# Altium PCB SCD2326功率板-V0.3.PcbDoc
Units mm, origin at the board's own origin, x right, y up, seen from the top; angles counter-clockwise.
Board outline 103 x 53 mm, 2 copper layers (Top Layer, Bottom Layer), stack 0.325 mm thick; 31 components, 13 nets, 105 pads, 0 vias.
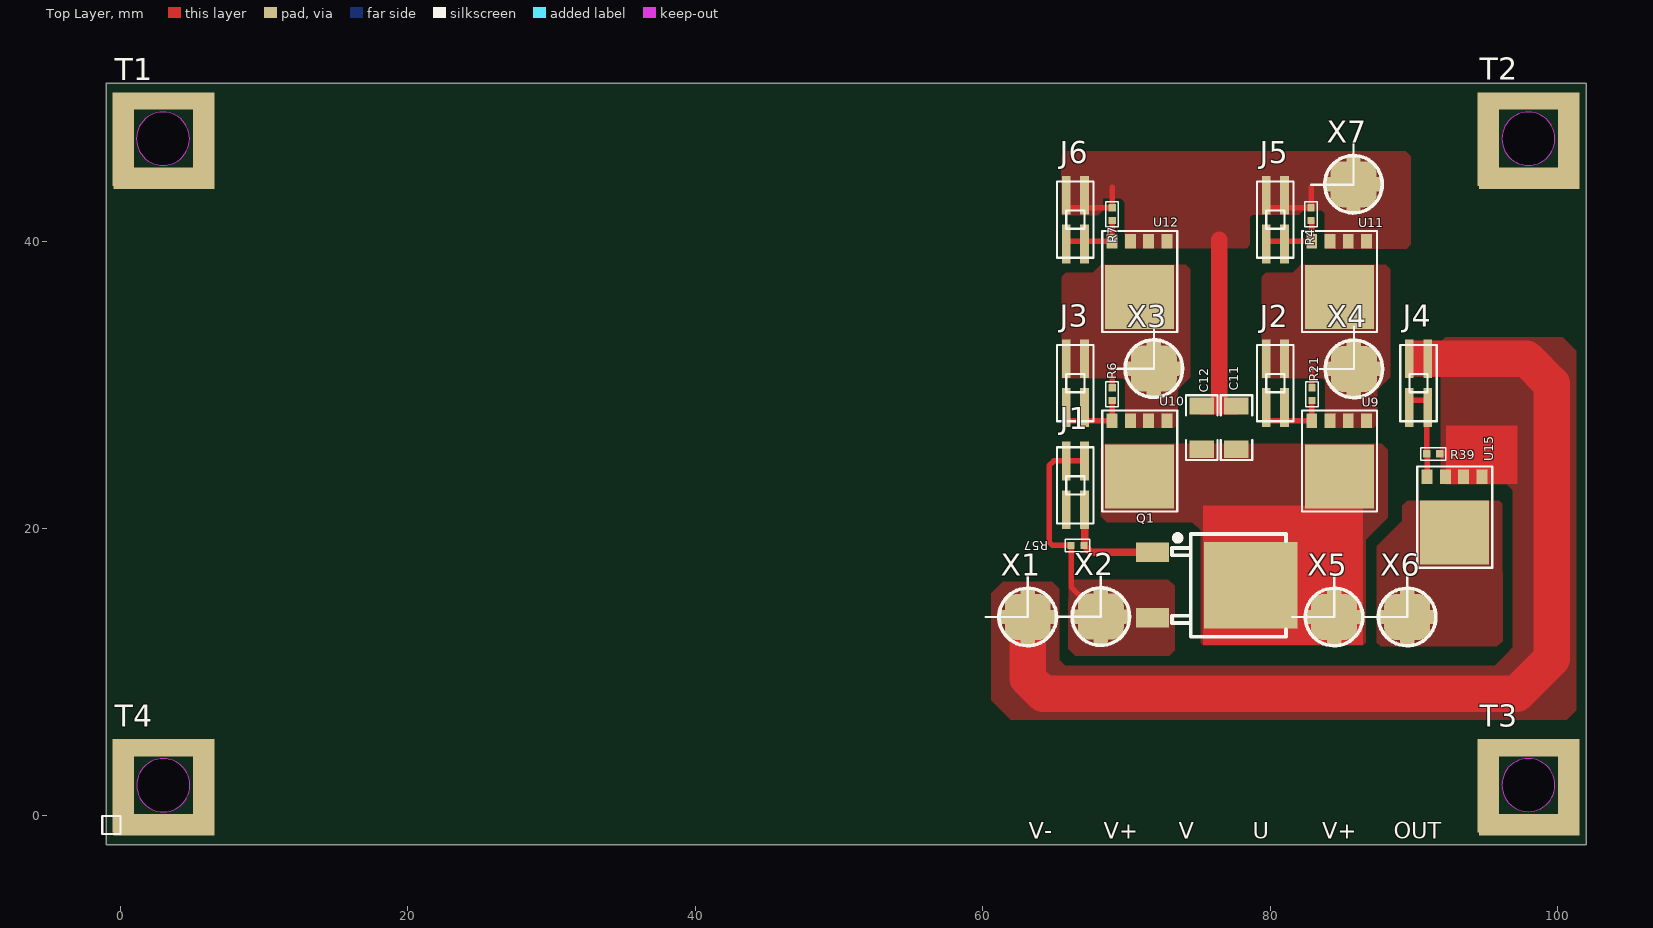
[diagram p0: Top Layer view]
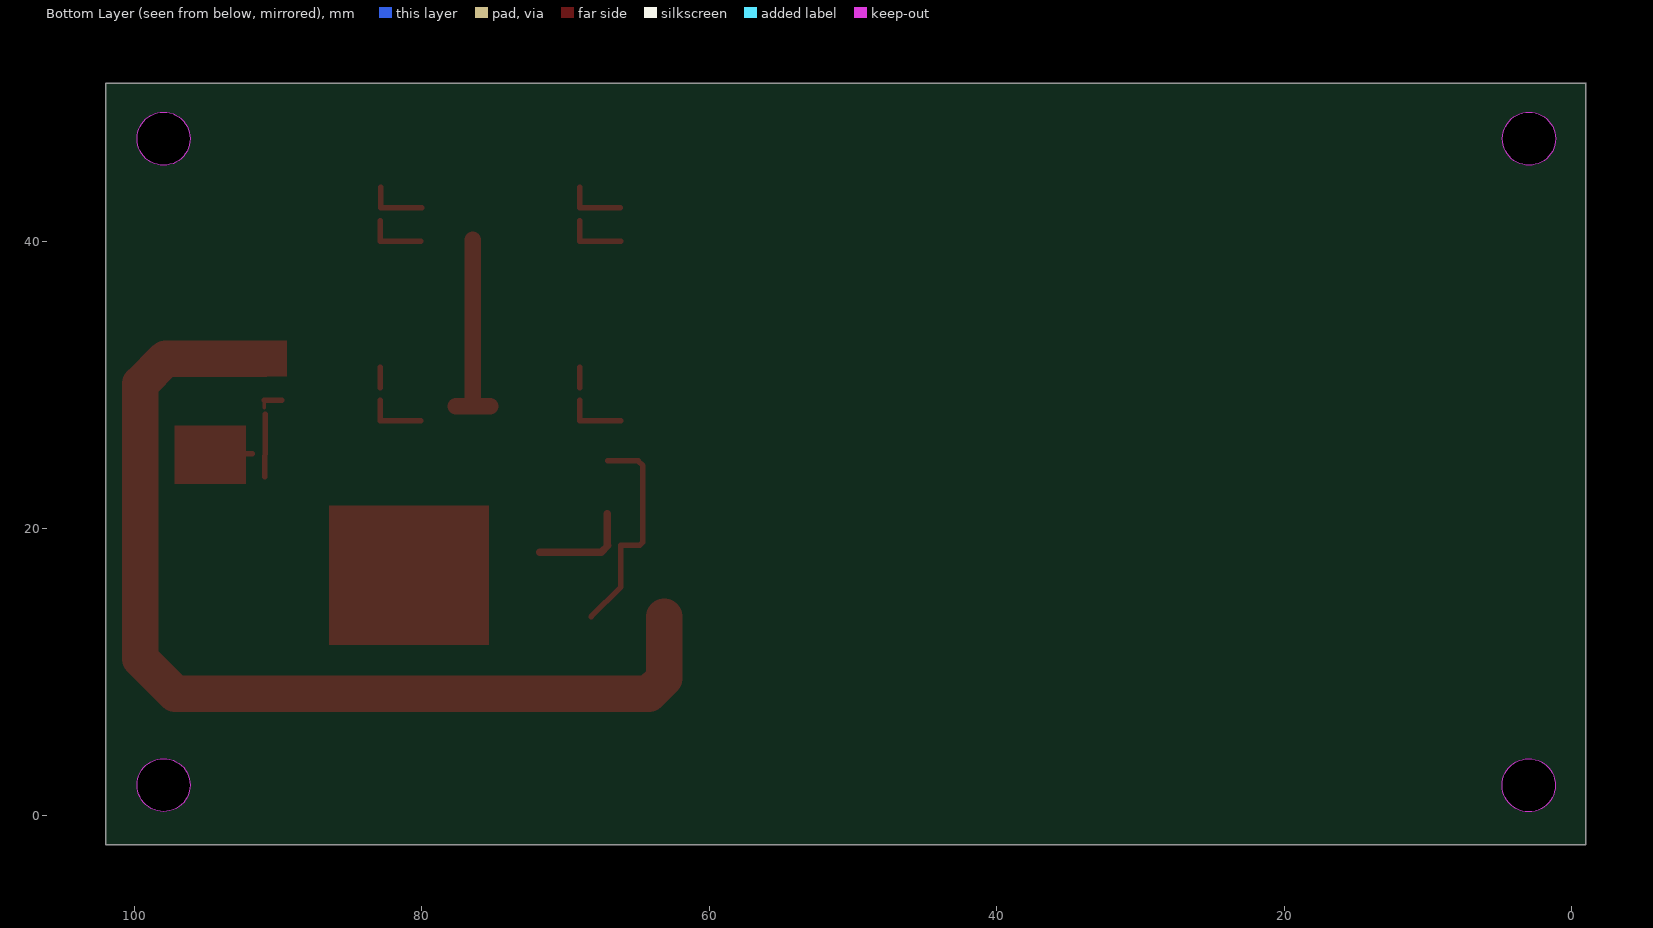
[diagram p1: Bottom Layer view, seen from below]

## Layer stack, top to bottom
Top Solder: solder mask 0.0102, Solder Resist, Dk 3.5
Top Layer: signal copper 0.0356
Dielectric 1: core 0.254, PP-006, Dk 4.2
Bottom Layer: signal copper 0.0356
Bottom Solder: solder mask 0.0102, Solder Resist, Dk 3.5

## Board outline
-0.991,-2 102,-2 102,51 -0.991,51 -1,50.978
cut-out: 96.125,2.144 ccw(c97.975,2.144) 97.975,0.294 ccw(c97.975,2.144) 99.825,2.144 ccw(c97.975,2.144) 97.975,3.994 ccw(c97.975,2.144)
cut-out: 1.13,2.128 ccw(c2.98,2.128) 2.98,0.278 ccw(c2.98,2.128) 4.83,2.128 ccw(c2.98,2.128) 2.98,3.978 ccw(c2.98,2.128)
cut-out: 1.103,47.127 ccw(c2.953,47.127) 2.953,45.277 ccw(c2.953,47.127) 4.803,47.127 ccw(c2.953,47.127) 2.953,48.977 ccw(c2.953,47.127)
cut-out: 96.125,47.127 ccw(c97.975,47.127) 97.975,45.277 ccw(c97.975,47.127) 99.825,47.127 ccw(c97.975,47.127) 97.975,48.977 ccw(c97.975,47.127)

## Design rules (kind name [scope] priority, off if disabled: settings)
Clearance [All] p1: gap=0.152
HoleSize [All] p1 off: absolutevalues=TRUE maxlimit=2.54 minlimit=0.025 maxpercent=80.000 minpercent=20.000
HoleToHoleClearance [All] p1 off: gap=0.254 allowstackedmicrovias=TRUE
LayerPairs [All] p1 off: enforce=TRUE
MinimumSolderMaskSliver [All] p1 off: minsoldermaskwidth=0.254
PlaneConnect [All] p1: planeconnectstyle=Direct reliefexpansion=0.508 reliefentries=4 reliefconductorwidth=0.254 reliefairgap=0.254
PolygonConnect [All] p1: connectstyle=Direct reliefconductorwidth=0.254 reliefentries=4 polygonreliefangle="90 Angle" airgapwidth=0.254
RoutingVias [All] p1: holewidth=0.711 width=1.27 viastyle="Through Hole" minholewidth=0.25 minwidth=0.45 maxholewidth=0.711 maxwidth=1.27
SilkToBoardRegionClearance [All] p1 off:
SilkToSilkClearance [All] p1 off: silktosilkclearance=0.254
SilkToSolderMaskClearance [IsPad] p1 off: minsilkscreentomaskgap=0.254 clearancetoexposedcopper=TRUE
SolderMaskExpansion [All] p1: expansion=0.102
Width [All] p1: maxlimit=2.54 minlimit=0.152 preferedwidth=0.254
21 further rules are at their usual default settings.

## Components (designator, comment, footprint, x,y, rotation, side; value= is the part's Value field where it differs from the comment)
C11 "10uF/50V/10%/1206/X7R" SC1206 77.659,27.018 r270 top
C12 "10uF/50V/10%/1206/X7R" SC1206 75.246,27.018 r270 top
J1 "1.27mm 2*2P贴片排针" CON_1D27_2X2TP 65.811,23 r90 top
J2 "1.27mm 2*2P贴片排针" CON_1D27_2X2TP 79.733,30.115 r90 top
J3 "1.27mm 2*2P贴片排针" CON_1D27_2X2TP 65.811,30.115 r90 top
J4 "1.27mm 2*2P贴片排针" CON_1D27_2X2TP 89.69,30.115 r90 top
J5 "1.27mm 2*2P贴片排针" CON_1D27_2X2TP 79.733,41.494 r90 top
J6 "1.27mm 2*2P贴片排针" CON_1D27_2X2TP 65.811,41.494 r90 top
Q1 "CMD80P06" TO-252-2 71.704,18.339 r270 top
R4 "10K/1%/0402" SR0402#1 82.855,41.872 r90 top
R6 "10K/1%/0402" SR0402#1 69.012,29.35 r90 top
R7 "10K/1%/0402" SR0402#1 69.012,41.872 r90 top
R21 "10K/1%/0402" SR0402#1 82.906,29.35 r90 top
R39 "10K/1%/0402" SR0402#2 91.364,25.171 r180 top
R57 "10K/1%" SR0402#1 66.599,18.821 r180 top
T1 "M3X₵5.5X4.0+₵3.6X1.5" M3_TP 3,47 r0 top
T2 "M3X₵5.5X4.0+₵3.6X1.5" M3_TP 98,47 r0 top
T3 "M3X₵5.5X4.0+₵3.6X1.5" M3_TP 98,2 r0 top
T4 "M3X₵5.5X4.0+₵3.6X1.5" M3_TP 3,2 r0 top
U9 "NCEP065N12" PG-TDSON-8 84.763,25.797 r180 top
U10 "NCEP065N12" PG-TDSON-8 70.866,25.797 r180 top
U11 "NCEP065N12" PG-TDSON-8 84.763,38.293 r180 top
U12 "NCEP065N12" PG-TDSON-8 70.866,38.293 r180 top
U15 "NCEP065N12" PG-TDSON-8 92.786,21.895 r180 top
X1 "底直径3身直径2总长6.5mm铜镀金实心导电车件铜柱" CON_3D0_1TP 63.135,13.843 r180 top
X2 "底直径3身直径2总长6.5mm铜镀金实心导电车件铜柱" CON_3D0_1TP 68.218,13.868 r180 top
X3 "底直径3身直径2总长6.5mm铜镀金实心导电车件铜柱" CON_3D0_1TP 71.907,31.128 r180 top
X4 "底直径3身直径2总长6.5mm铜镀金实心导电车件铜柱" CON_3D0_1TP 85.829,31.106 r180 top
X5 "底直径3身直径2总长6.5mm铜镀金实心导电车件铜柱" CON_3D0_1TP 84.455,13.843 r180 top
X6 "底直径3身直径2总长6.5mm铜镀金实心导电车件铜柱" CON_3D0_1TP 89.538,13.843 r180 top
X7 "底直径3身直径2总长6.5mm铜镀金实心导电车件铜柱" CON_3D0_1TP 85.801,43.955 r0 top

## Footprints (in the part's own frame and the unit in brackets; to place one, negate y for a bottom-side part, rotate by r counter-clockwise, add the part's x,y. Pads: shape width x height; smd on the part's side, far side on the other; paste and mask are expansions set on the pad)
CON_1D27_2X2TP [mm]
  rect 2.7x0.6 smd: 1(-1.7,0) 2(1.7,0) 3(-1.7,-1.27) 4(1.7,-1.27)
  silkscreen extent -2.65,-1.91 2.65,0.64
CON_3D0_1TP [mm]
  rrect50% 4x1 smd: 1(-0.01,0)
  rrect50% 3.2x3.2 smd: 1(0,0)
  rrect50% 1x4 smd: 1(0,-0.02)
  silkscreen extent -2,-2 2,2
M3_TP [mm]
  rect 1.5x6.5 smd: 1(-2.819,0.102) 1(2.794,0.102)
  rect 6.5x1.2 smd: 1(-0.025,2.743)
  rect 7x1.5 smd: 1(0.025,-2.616)
PG-TDSON-8 [mm]
  rect 0.75x1 smd: 1(1.858,-1.708) 3(-1.952,-1.708) 3(-0.682,-1.708) 3(0.588,-1.708)
  rect 4.8x4.45 smd: 2(-0.052,2.173)
  silkscreen extent -2.67,-2.41 2.54,4.62, body extent -2.63,-2 2.52,4.15, height 1.1
SC1206 [mm]
  rect 1.2x1.7 smd: 1(-1.5,0) 2(1.5,0)
  silkscreen extent -2.25,-1.1 2.25,1.1, body extent -2.27,-0.8 2.27,0.8, height 1.25
SR0402#1 [mm]
  rect 0.5x0.5 smd: 1(-0.445,0) 2(0.444,0)
  silkscreen extent -0.86,-0.43 0.86,0.43, body extent -0.5,-0.25 0.5,0.25, height 0.35
SR0402#2 [mm]
  rect 0.508x0.508 smd: 1(-0.435,-0.025) 2(0.454,-0.025)
  silkscreen extent -0.85,-0.46 0.87,0.41
TO-252-2 [mm]
  rect 1.35x2.3 smd: 1(0,0.1) 3(4.55,0.1)
  rect 6x6.5 smd: 2(2.292,6.95)
  silkscreen extent -1.28,1.47 5.87,9.4

## Part data
C11 C12: library part CAP, "X7R/0402"
J1 J2 J3 J4 J5 J6: library part "HEADER 2X2"
Q1: library part WSF50P10
R4 R6 R7 R21: library part RES2
R39: library part Res2, "Resistor"
R57: library part RES2, "X7R/0603"
T1 T2 T3 T4: library part M3X?5.5X10+?4.1X1.5, "https://item.taobao.com/item.htm?id=655855111684&mi_id=00001ooHujBaGzHg-LCBfWhVe6oH8mw_k8j5GujWoe4PlPw&spm=tbpc.boughtlist.suborder_itemtitle.1.4df22e8dmvWkNb"
U9 U10 U11 U12 U15: library part CXYG_N, "场效应管N沟道"
X1 X2 X3 X4 X5 X6 X7: library part CON1, "https://item.taobao.com/item.htm?spm=a1z09.2.0.0.28292e8dsDHJ66&id=616436650412&_u=f1hghf6m80e1"

## Nets (pads, with @x,y where several pads share a name; then routed paths per layer and width w, separated by ;. In a path a pad name is that pad's centre, name@x,y a point inside that pad or via, vN(x,y) a via of type N, cw(c..) or ccw(c..) an arc to the next point about the centre after c; other vN are vias at no path point)
GH: J1.1 J1.3 Q1.1 R57.1 | length 7.2
  Top Layer w0.508: R57.1 67.526,18.339 Q1.1 ; R57.1@67.107,18.822 J1.3@67.107,21.046
GL: J4.1 J4.3 R39.2 U15.1 | length 5.9
  Top Layer w0.254: J4.3 J4.3@90.96,28.921
  Top Layer w0.381: J4.1@89.764,28.921 J4.3@90.96,28.921 ; R39.2 J4.3@90.91,27.965 ; U15.1 R39.2@90.928,25.044
GND: J4.2 J4.4 R39.1 U15.3 X1.1 | length 72.2
  Top Layer w0.381: R39.1 93.345,25.196
  Top Layer w2.54: X1.1@63.135,13.843 63.135,9.566 64.217,8.484 97.155,8.484 99.593,10.922 99.593,30.061 97.84,31.815 J4.4
OUT_1: U15.2 X6.1
U+: J2.2 J2.4 R21.2 U9.3 U11.2 X4.1 | length 1.4
  Top Layer w0.381: R21.2 82.906,31.217
U_GH: J2.1 J2.3 R21.1 U9.1 | length 4.3
  Top Layer w0.381: 80.072,27.505 U9.1 R21.1@82.904,28.928
U_GL: J5.1 J5.3 R4.1 U11.1 | length 4.3
  Top Layer w0.381: 80.072,40.001 U11.1 R4.1@82.904,41.424
V: J3.2 J3.4 R6.2 U10.3 U12.2 X3.1 | length 1.4
  Top Layer w0.381: R6.2 69.012,31.217
V-: C11.1 C12.1 J5.2 J5.4 J6.2 J6.4 R4.2 R7.2 U11.3 U12.3 X7.1 | length 22.4
  Top Layer w0.381: 66.18,42.317 R7.2 69.012,43.739 ; J5.2@80.023,42.317 R4.2 82.855,43.739
  Top Layer w1.143: C12.1 C11.1 ; 76.454,28.575 76.454,40.09
V_GH: J3.1 J3.3 R6.1 U10.1 | length 4.3
  Top Layer w0.381: 66.176,27.505 U10.1 R6.1@69.008,28.928
V_GL: J6.1 J6.3 R7.1 U12.1 | length 4.3
  Top Layer w0.381: 66.176,40.001 U12.1 R7.1@69.008,41.424
VIN: J1.2 J1.4 Q1.3 R57.2 X2.1 | length 15.4
  Top Layer w0.381: J1.4 J1.2 64.946,24.7 64.618,24.372 64.618,19.05 64.846,18.821 R57.2 66.154,15.942 X2.1@68.228,13.868
VP+: C11.2 C12.2 Q1.2 U9.2 U10.2 X5.1
pads on no net: T1.1 T2.1 T3.1 T4.1

## Polygon pours and split planes (outlines as drawn)
U+ on Top Layer "Top Layer-No Net" (solid, remove dead copper, pour order 25): 79.403,30.468 79.403,37.504 79.683,37.783 81.562,37.783 82.121,38.342 88.039,38.342 88.344,38.037 88.344,30.519 87.506,29.68 87.455,29.63 87.455,27.242 87.226,27.013 83.823,27.013 83.823,30.29 83.645,30.468
V on Top Layer "Top Layer-No Net" (solid, remove dead copper, pour order 26): 65.507,30.468 65.507,37.504 65.786,37.783 67.666,37.783 68.224,38.342 74.143,38.342 74.447,38.037 74.447,30.519 73.609,29.68 73.558,29.63 73.558,27.242 73.33,27.013 69.926,27.013 69.926,30.29 69.748,30.468
V- on Top Layer "Top Layer-No Net" (solid, remove dead copper, pour order 23): 65.456,41.796 68.047,41.796 68.351,42.101 68.351,42.914 68.428,42.99 69.571,42.99 69.698,42.863 69.901,42.66 69.901,39.51 78.359,39.51 78.588,39.739 78.588,41.669 78.765,41.847 82.042,41.847 82.347,42.152 83.566,42.152 83.795,41.923 83.795,39.51 83.82,39.485 89.51,39.485 89.789,39.764 89.789,45.911 89.433,46.267 65.862,46.267 65.481,45.886
VIN on Top Layer "Top Layer-No Net" (solid, remove dead copper, pour order 47): 65.964,14.097 65.964,16.078 66.319,16.434 72.923,16.434 73.355,16.002 73.355,11.532 72.974,11.151 66.446,11.151 65.964,11.633 65.964,16.053 65.989,16.078
VP+ on Top Layer "Top Layer-No Net" (solid, remove dead copper, pour order 49): 85.319,11.862 86.462,11.862 86.639,12.04 86.639,19.216 88.189,20.765 88.189,25.476 87.782,25.883 68.529,25.883 68.224,25.578 68.224,20.853 68.631,20.447 74.574,20.447 75.159,19.863 75.159,12.065 75.336,11.887
OUT_1 on Top Layer "Top Layer-No Net" (solid, remove dead copper, pour order 51): 87.63,11.811 95.758,11.811 96.19,12.141 96.164,21.717 95.936,21.946 89.56,21.946 89.205,21.59 89.205,20.549 87.427,18.771 87.427,12.065 87.655,11.836
GND on Top Layer "Top Layer-No Net" (solid, remove dead copper, pour order 53): 64.11,16.307 61.392,16.307 60.579,15.494 60.579,8.052 61.951,6.68 100.635,6.68 101.295,7.341 101.295,32.36 100.355,33.299 92.177,33.299 91.872,32.995 91.872,23.444 92.227,23.089 96.469,23.089 96.901,22.657 96.901,11.735 96.418,11.252 95.631,10.465 69.393,10.465 65.735,10.465 65.329,10.871 65.329,15.824 64.846,16.307

## Other copper
Top Layer:
  rectangle net GND: 89.383,30.569 91.288,33.084
  rectangle net GND: 92.227,23.089 97.231,27.153
  rectangle net VP+: 75.336,11.887 86.462,21.615

## Silkscreen, mask and mechanical layers (free items; w line width, h text height)
Top Overlay:
  lines w0.152: 60.196,13.836 63.145,13.836 ; 63.138,13.843 63.138,16.792 ; 65.279,13.861 68.228,13.861 ; 68.22,13.868 68.22,16.817 ; 68.978,31.121 71.927,31.121 ; 71.92,31.128 71.92,34.077 ; 81.526,13.836 84.475,13.836 ; 82.862,43.928 85.811,43.928 ; 82.89,31.098 85.839,31.098 ; 84.468,13.843 84.468,16.792 ; 85.804,43.935 85.804,46.884 ; 85.832,31.106 85.832,34.055 ; 86.609,13.836 89.558,13.836 ; 89.55,13.843 89.55,16.792 ; -1.27,-1.27 0,-1.27 0,0 -1.27,0 -1.27,-1.27 ; 65.811,22.365 65.811,23.635 67.081,23.635 67.081,22.365 65.811,22.365 ; 65.811,29.48 67.081,29.48 67.081,30.75 65.811,30.75 65.811,29.48 ; 65.811,40.859 67.081,40.859 67.081,42.129 65.811,42.129 65.811,40.859 ; 79.733,29.48 81.003,29.48 81.003,30.75 79.733,30.75 79.733,29.48 ; 79.733,40.859 81.003,40.859 81.003,42.129 79.733,42.129 79.733,40.859 ; 89.69,29.48 90.96,29.48 90.96,30.75 89.69,30.75 89.69,29.48
  text "V-" at 63.195,-1.6 h1.14
  text "V+" at 68.428,-1.6 h1.14
  text "V" at 73.635,-1.6 h1.14
  text "U" at 78.791,-1.6 h1.14
  text "V+" at 83.617,-1.6 h1.14
  text "OUT" at 88.595,-1.6 h1.14
Mechanical 1:
  lines w0.254: -1,-1.981 -1,50.978 ; -0.991,-2 102,-2 102,51 -0.991,51
Mechanical 3: